# Altium PCB ZYNQ_BOARD.PcbDoc (part 7 of 9)
Units mm, origin at the board's own origin, x right, y up, seen from the top; angles counter-clockwise.
Board outline 120 x 66 mm, 10 copper layers (Top Layer, Internal Plane 1 (GND), Middle Layer 1, Middle Layer 2, Internal Plane 2 (+1.0V), Middle Layer 3, Middle Layer 4, Middle Layer 5 (PWR), Internal Plane 3 (GND), Bottom Layer), stack 0.982 mm thick; 333 components, 331 nets, 1511 pads, 1077 vias.
Unrouted connection lines stored in the file: 30.
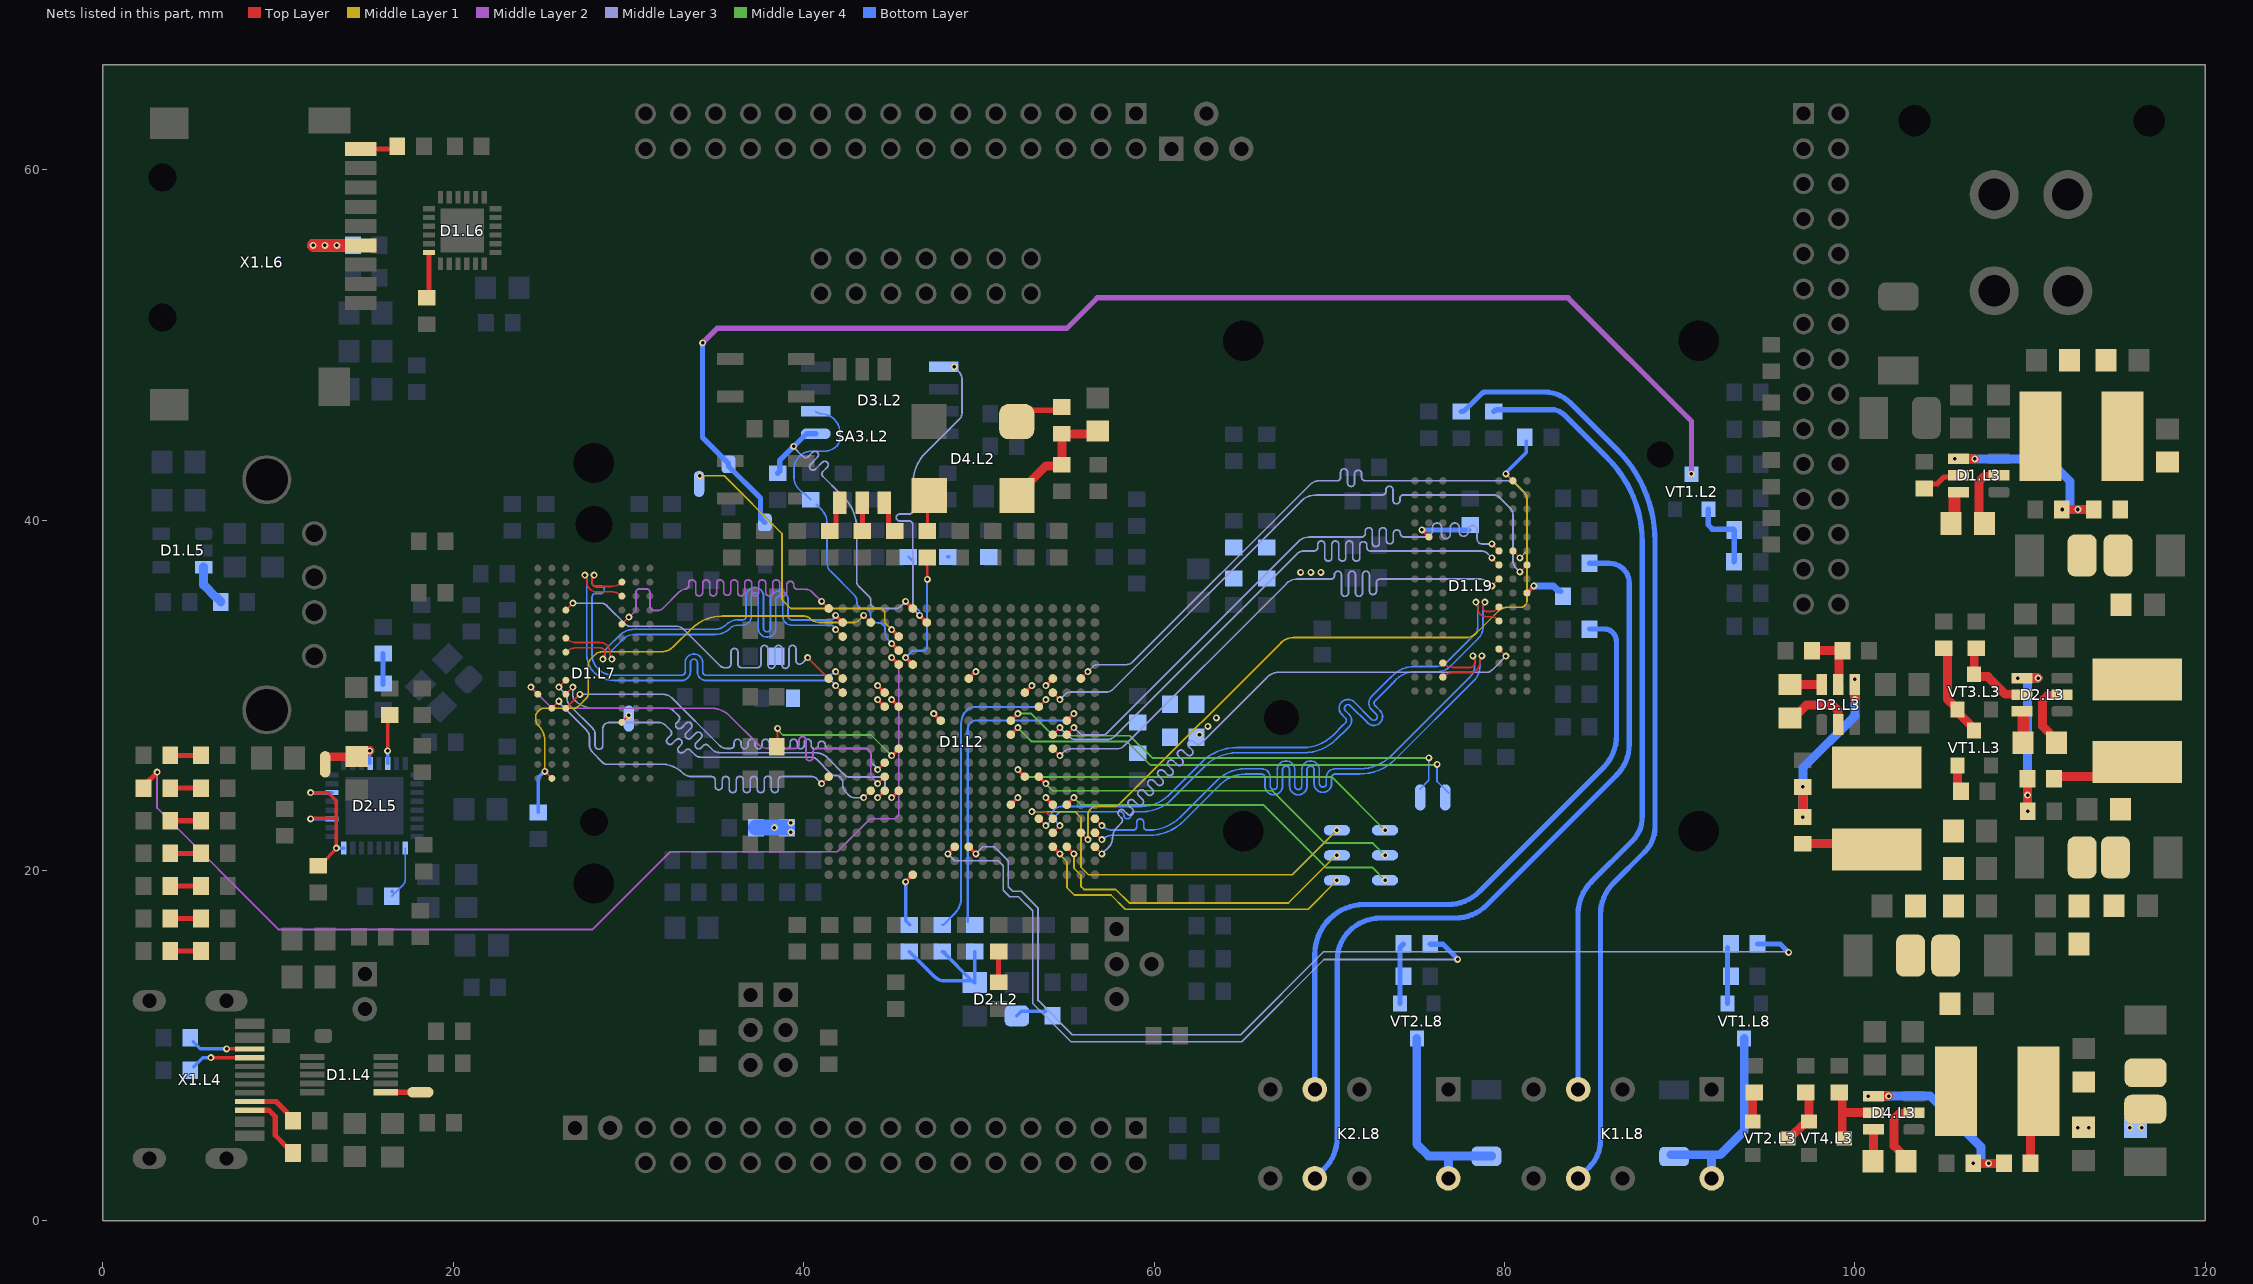
[diagram p15: the nets of this part, all layers, seen from the top]

## Via types
v1: diameter 0.4, hole 0.2, Top Layer to Bottom Layer, 1059 vias
v2: diameter 0.9, hole 0.6, Top Layer to Bottom Layer, 18 vias

## Nets (pads, with @x,y where several pads share a name; then routed paths per layer and width w, separated by ;. In a path a pad name is that pad's centre, name@x,y a point inside that pad or via, vN(x,y) a via of type N, cw(c..) or ccw(c..) an arc to the next point about the centre after c; other vN are vias at no path point) (continued)
LDM_M: D1.L2.A1 D1.L7.E7 | length 26.1
  Top Layer w0.1: D1.L7.E7@29.62,34.065 v1(30.02,34.465) ; v1(41.02,35.36) D1.L2.A1@41.42,34.96
  Middle Layer 2 w0.1: v1(30.02,34.465) 30.365,34.81 ccw(c30.232,34.943) 30.42,34.943 30.42,35.869 cw(c30.63,35.869) 30.63,36.079 31.01,36.079 cw(c31.01,35.869) 31.22,35.869 31.22,35.103 ccw(c31.493,35.103) 31.3,34.91 ccw(c31.443,35.053) 31.443,34.851 31.714,34.851 ccw(c31.714,35.164) 31.935,34.943 32.899,35.906 cw(c33.282,35.522) 33.175,36.054 cw(c33.282,35.522) 33.179,36.055 cw(c33.282,35.522) 33.229,36.062 33.239,36.063 ccw(c33.229,36.263) 33.429,36.263 33.429,36.394 cw(c33.629,36.394) 33.829,36.394 33.829,35.876 ccw(c34.029,35.876) 34.229,35.876 34.229,36.394 cw(c34.429,36.394) 34.629,36.394 34.629,35.876 ccw(c34.829,35.876) 35.029,35.876 35.029,36.394 cw(c35.229,36.394) 35.429,36.394 35.429,35.91 ccw(c35.629,35.91) 35.829,35.91 35.829,36.394 cw(c36.029,36.394) 36.229,36.394 36.229,35.876 ccw(c36.429,35.876) 36.629,35.876 36.629,36.394 cw(c36.829,36.394) 37.029,36.394 37.029,35.876 ccw(c37.229,35.876) 37.429,35.876 37.429,36.394 cw(c37.629,36.394) 37.829,36.394 37.829,35.876 ccw(c38.029,35.876) 38.229,35.876 38.229,36.394 cw(c38.429,36.394) 38.629,36.394 38.629,35.876 ccw(c38.829,35.876) 39.029,35.876 39.029,36.31 cw(c39.229,36.31) 39.429,36.31 39.429,36.265 ccw(c39.629,36.265) 39.629,36.065 40.039,36.065 40.104,36.062 cw(c40.039,35.398) 40.154,36.055 cw(c40.039,35.398) 40.223,36.039 cw(c40.039,35.398) 40.51,35.87 40.511,35.869 v1(41.02,35.36)
LDQS_M_N: D1.L2.B2 D1.L7.G3 | length 24.8
  Top Layer w0.1: D1.L7.G3@26.42,32.465 26.421,32.466 cw(c27.024,31.861) 27.024,32.715 28.391,32.715 cw(c28.391,32.466) 28.64,32.466 28.64,32.335 cw(c28.452,32.335) v1@28.585,32.202
  Top Layer w0.2: v1(41.82,34.56) D1.L2.B2@42.22,34.16
  Bottom Layer w0.1: v1(28.53,32.066) 28.53,32.069 cw(c28.718,32.069) 28.585,32.202 ccw(c28.452,32.335) 28.64,32.335 28.64,32.338 cw(c29.235,32.338) 28.814,32.759 29.462,33.406 cw(c30.358,32.509) 30.358,33.777 34.95,33.777 ccw(c34.95,34.64) 35.56,34.03 ; 35.561,34.031 cw(c36.235,33.357) 36.235,34.31 36.306,34.31 36.506,34.31 ccw(c36.506,34.51) 36.706,34.51 36.706,35.654 cw(c37.206,35.654) 37.706,35.654 37.706,33.825 ccw(c37.906,33.825) 38.106,33.825 38.106,35.457 cw(c38.606,35.457) 39.106,35.457 39.106,34.51 ccw(c39.306,34.51) 39.306,34.31 39.951,34.31 41.48,34.31 ccw(c41.48,34.714) 41.765,34.428 ccw(c41.634,34.56) v1(41.82,34.56)
LDQS_M_P: D1.L2.C2 D1.L7.F3 | length 24.8
  Top Layer w0.1: D1.L7.F3@26.42,33.265 ccw(c27.024,33.869) 27.024,33.015 28.391,33.015 cw(c28.391,32.466) 28.94,32.466 28.94,32.335 ccw(c29.128,32.335) v1@28.995,32.202 ; v1(41.82,33.76) D1.L2.C2@42.22,33.36
  Bottom Layer w0.1: v1(29.05,32.066) 29.05,32.069 ccw(c28.862,32.069) 28.995,32.202 cw(c29.128,32.335) 28.94,32.335 cw(c29.242,32.335) 29.028,32.548 29.673,33.193 cw(c30.36,32.505) 30.36,33.477 34.952,33.477 ccw(c34.952,34.634) 35.77,33.816 35.772,33.818 cw(c36.236,33.354) 36.236,34.01 36.306,34.01 36.506,34.01 ccw(c36.506,34.51) 37.006,34.51 37.006,35.654 cw(c37.206,35.654) 37.406,35.654 37.406,33.825 ccw(c37.906,33.825) 38.406,33.825 38.406,35.457 cw(c38.606,35.457) 38.806,35.457 38.806,34.51 ccw(c39.306,34.51) 39.306,34.01 39.951,34.01 41.48,34.01 cw(c41.48,33.606) 41.765,33.892 cw(c41.634,33.76) v1(41.82,33.76)
LDQS_N: D1.L2.U17 D1.L9.G3 | length 36.3
  Top Layer w0.1: D1.L2.U17@54.22,22.16 v1(54.62,22.56) ; v1@78.825,35.189 ccw(c78.958,35.056) 78.77,35.056 78.77,34.97 ccw(c78.927,34.97) 78.816,34.859 78.825,34.85 ccw(c78.958,34.983) 78.958,34.795 79.23,34.795 ccw(c79.23,35.295) 79.584,34.941 79.68,35.038 D1.L9.G3@79.68,35.045
  Bottom Layer w0.1: v1(54.62,22.56) cw(c54.62,22.601) 54.591,22.572 54.516,22.646 cw(c54.87,23) 54.37,23 cw(c54.684,23) 54.462,23.222 54.49,23.25 cw(c54.756,22.984) 54.756,23.36 57.624,23.36 58.074,23.36 cw(c58.074,23.16) 58.274,23.16 58.274,23.151 ccw(c58.474,23.151) 58.674,23.151 58.674,23.16 cw(c58.874,23.16) 58.874,23.36 59.304,23.36 59.514,23.369 ccw(c59.304,25.774) 59.564,23.374 ccw(c59.304,25.774) 61.011,24.067 62.92,25.976 cw(c64.716,24.18) 64.716,26.72 68.503,26.72 ccw(c68.503,29.441) 70.427,27.517 70.983,28.073 71.124,28.214 ccw(c70.771,28.568) 71.124,28.922 70.92,29.126 cw(c71.061,29.269) 71.203,29.409 ; 71.203,29.409 72.182,28.43 ccw(c72.536,28.783) 72.889,29.137 72.61,29.416 cw(c72.751,29.558) 72.61,29.7 73.583,30.673 ; 73.584,30.674 73.725,30.815 73.83,30.92 cw(c74.868,29.882) 74.868,31.35 76.133,31.35 ccw(c76.133,32.463) 76.92,31.676 78.513,33.269 ccw(c77.89,33.891) 78.718,33.592 ccw(c77.89,33.891) 78.77,33.891 78.77,35.056 cw(c78.958,35.056) 78.825,35.189 ccw(c78.692,35.322) 78.88,35.322 v1(78.88,35.325)
LDQS_P: D1.L2.T16 D1.L9.F3 | length 36.3
  Top Layer w0.1: D1.L2.T16@53.42,22.96 v1(53.82,22.56) ; v1@78.415,35.189 cw(c78.282,35.056) 78.47,35.056 78.47,34.969 ccw(c78.925,34.969) 78.603,34.648 78.614,34.637 ccw(c78.957,34.981) 78.957,34.495 79.23,34.495 cw(c79.23,33.995) 79.584,34.349 79.68,34.252 D1.L9.F3@79.68,34.245
  Bottom Layer w0.1: v1(53.82,22.56) ccw(c53.82,22.601) 53.849,22.572 53.924,22.646 ccw(c53.57,23) 54.07,23 54.07,23.002 cw(c54.68,23.002) 54.249,23.433 54.279,23.463 cw(c54.754,22.987) 54.754,23.66 59.303,23.66 ccw(c59.303,25.777) 60.8,24.28 62.709,26.189 cw(c64.715,24.183) 64.715,27.02 68.499,27.02 ccw(c68.499,29.451) 70.218,27.732 70.771,28.285 70.912,28.426 ; 70.912,28.71 70.707,28.915 cw(c71.061,29.269) 71.415,29.621 72.394,28.643 ; 70.913,28.427 ccw(c70.771,28.568) 70.912,28.71 ; 72.394,28.642 ccw(c72.536,28.783) 72.677,28.925 72.398,29.204 cw(c72.751,29.558) 72.398,29.912 73.371,30.886 ; 73.372,30.886 73.513,31.027 73.62,31.135 cw(c74.865,29.89) 74.865,31.65 76.132,31.65 ccw(c76.132,32.708) 76.142,31.65 ; 76.142,31.65 ccw(c76.133,32.463) 76.708,31.888 78.299,33.48 ccw(c77.89,33.891) 78.47,33.88 ccw(c77.642,33.893) 78.47,33.893 78.47,34.236 78.47,35.056 ccw(c78.282,35.056) 78.415,35.189 cw(c78.548,35.322) 78.36,35.322 v1(78.36,35.325)
MEM0_BUS.MEM_CLK_PSM.UDQS_PSM_N: D1.L2.F2 D1.L7.B7 | length 24.9
  Top Layer w0.1: v1@27.975,36.728 ccw(c28.108,36.595) 27.92,36.595 27.92,36.464 ccw(c28.169,36.464) 28.169,36.215 29.016,36.215 ccw(c29.016,37.069) D1.L7.B7@29.619,36.464 ; v1(41.82,31.36) D1.L2.F2@42.22,30.96
  Bottom Layer w0.1: v1(28.03,36.864) 28.03,36.861 cw(c27.842,36.861) 27.975,36.728 ccw(c28.108,36.595) 27.92,36.595 27.92,36.42 ccw(c28.12,36.42) 28.12,36.22 28.419,36.22 cw(c28.419,36.02) 28.419,35.82 28.12,35.82 ccw(c28.12,35.62) 27.92,35.62 27.92,32.303 ccw(c29.013,32.303) 28.24,31.53 ccw(c29.157,32.447) 29.157,31.15 32.83,31.15 33.03,31.15 ccw(c33.03,31.35) 33.23,31.35 33.23,31.864 cw(c33.73,31.864) 34.23,31.864 34.23,31.35 ccw(c34.43,31.35) 34.43,31.15 35.96,31.15 41.266,31.15 ccw(c41.266,32.004) v1@41.87,31.4
MEM0_BUS.MEM_CLK_PSM.UDQS_PSM_P: D1.L2.G2 D1.L7.C7 | length 24.8
  Top Layer w0.1: v1@27.565,36.728 cw(c27.432,36.595) 27.62,36.595 27.62,36.464 ccw(c28.169,36.464) 28.169,35.915 29.016,35.915 cw(c29.016,35.061) D1.L7.C7@29.62,35.665 ; v1(41.82,30.56) D1.L2.G2@42.22,30.16
  Bottom Layer w0.1: v1(27.51,36.864) 27.51,36.861 ccw(c27.698,36.861) 27.565,36.728 cw(c27.432,36.595) 27.62,36.595 27.62,32.3 ccw(c29.007,32.3) 28.026,31.32 28.03,31.316 ccw(c29.155,32.441) 29.155,30.85 32.83,30.85 33.03,30.85 ccw(c33.03,31.35) 33.53,31.35 33.53,31.864 cw(c33.73,31.864) 33.93,31.864 33.93,31.35 ccw(c34.43,31.35) 34.43,30.85 35.96,30.85 41.266,30.85 cw(c41.266,29.996) v1@41.87,30.6
MEM0_BUS.MEM_CMD_PSM.CAS_PSM: D1.L2.P5 D1.L7.K3 | length 25.8
  Top Layer w0.1: D1.L7.K3@26.42,30.065 v1(26.82,30.465) ; v1(44.22,24.16) D1.L2.P5@44.62,24.56
  Middle Layer 3 w0.1: 26.82,29.998 ccw(c27.208,29.998) 26.934,29.723 ccw(c28.055,30.845) 28.055,29.259 32.292,29.259 cw(c32.292,28.923) 32.53,29.161 32.64,29.051 32.856,28.834 cw(c32.715,28.693) 32.856,28.552 32.746,28.441 ccw(c32.887,28.3) 32.746,28.158 ccw(c32.887,28.3) 33.029,28.158 33.28,28.41 cw(c33.422,28.268) 33.563,28.41 cw(c33.422,28.268) 33.563,28.127 33.292,27.855 ccw(c33.433,27.714) 33.292,27.572 ccw(c33.433,27.714) 33.574,27.572 33.846,27.844 cw(c33.987,27.703) 34.129,27.844 cw(c33.987,27.703) 34.129,27.561 33.857,27.29 ccw(c33.999,27.148) 33.857,27.007 ccw(c33.999,27.148) 34.14,27.007 34.271,27.137 cw(c34.412,26.996) 34.554,27.137 34.589,27.102 34.781,26.91 ccw(c35.22,27.349) 35.22,26.728 40.676,26.728 cw(c40.676,25.798) 41.333,26.456 42.369,25.42 ccw(c42.542,25.593) 42.542,25.348 44.352,25.348 cw(c44.352,25.046) 44.565,25.26 cw(c44.391,25.086) 44.637,25.086 44.637,24.824 cw(c44.066,24.824) 44.47,24.42 44.22,24.17 v1(44.22,24.16) cw(c44.22,24.235) v1@44.167,24.182 ; 26.82,29.999 v1(26.82,30.465)
MEM0_BUS.MEM_CMD_PSM.CS_PSM: D1.L2.N1 D1.L7.L2 | length 25.7
  Top Layer w0.1: D1.L7.L2@25.62,29.265 v1(26.02,29.665) ; v1(41.02,24.96) D1.L2.N1@41.42,25.36
  Middle Layer 3 w0.1: v1(26.02,29.665) 26.02,29.601 27.59,28.032 cw(c27.156,27.598) 27.769,27.598 27.769,27.173 ccw(c28.386,27.173) 27.95,26.737 28.495,26.191 ccw(c28.803,26.497) 28.803,26.064 31.917,26.064 cw(c31.917,24.421) 33.078,25.583 ccw(c33.607,26.112) 33.507,25.37 ccw(c33.607,26.112) 33.607,25.364 34.167,25.364 34.747,25.364 cw(c34.747,25.164) 34.947,25.164 34.947,24.803 ccw(c35.147,24.803) 35.347,24.803 35.347,25.171 cw(c35.547,25.171) 35.747,25.171 35.747,24.648 ccw(c35.947,24.648) 36.147,24.648 36.147,25.171 cw(c36.347,25.171) 36.547,25.171 36.547,24.648 ccw(c36.747,24.648) 36.947,24.648 36.947,25.171 cw(c37.147,25.171) 37.347,25.171 37.347,24.648 ccw(c37.547,24.648) 37.747,24.648 37.747,25.189 cw(c37.947,25.189) 38.147,25.189 38.147,24.648 ccw(c38.347,24.648) 38.547,24.648 38.547,25.164 cw(c38.747,25.164) 38.747,25.364 38.797,25.364 40.466,25.364 cw(c40.466,25.001) 40.723,25.257 v1(41.02,24.96)
MEM0_BUS.MEM_CMD_PSM.RAS_PSM: D1.L2.P4 D1.L7.J3 | length 25.7
  Top Layer w0.1: v1(26.02,30.465) D1.L7.J3@26.42,30.865 ; v1(43.42,24.16) D1.L2.P4@43.82,24.56
  Middle Layer 3 w0.1: v1(26.02,30.465) 26.366,30.119 cw(c26.068,29.82) 26.49,29.82 ccw(c27.088,29.82) 26.665,29.397 27.976,28.086 cw(c27.702,27.811) 28.09,27.811 28.09,27.143 ccw(c28.31,27.143) 28.31,26.923 ccw(c28.31,27.143) 28.53,27.143 28.53,28.11 cw(c28.849,28.11) 28.623,28.335 cw(c28.921,28.039) 28.921,28.459 31.74,28.459 cw(c31.74,27.974) 32.056,28.342 cw(c31.74,27.974) 32.083,28.317 32.401,27.999 cw(c32.26,27.857) 32.401,27.716 32.228,27.542 ccw(c32.369,27.401) 32.228,27.26 ccw(c32.369,27.401) 32.511,27.26 32.71,27.459 cw(c32.852,27.318) 32.993,27.459 cw(c32.852,27.318) 32.993,27.176 32.867,27.05 ccw(c33.009,26.909) 32.867,26.768 ccw(c33.009,26.909) 33.15,26.768 33.25,26.867 cw(c33.391,26.726) 33.533,26.867 33.801,26.599 33.812,26.588 ccw(c34.1,26.898) 33.851,26.556 ccw(c34.1,26.898) 33.939,26.507 ccw(c34.1,26.898) 34.1,26.475 40.43,26.475 cw(c40.43,26.032) 40.743,26.345 41.58,25.509 ccw(c41.77,25.699) 41.77,25.43 41.848,25.43 cw(c41.848,25.151) 42.045,25.348 42.15,25.244 cw(c41.955,25.05) 42.23,25.05 42.23,24.865 ccw(c42.752,24.865) 42.382,24.496 42.6,24.279 ; 42.6,24.278 ccw(c42.889,24.571) 42.889,24.16 ; 42.89,24.16 v1(43.42,24.16)
MEM0_BUS.MEM_CMD_PSM.WE_PSM: D1.L2.M5 D1.L7.L3 | length 25.7
  Top Layer w0.1: D1.L7.L3@26.42,29.265 v1@27.215,30.06 ; v1(44.22,25.76) D1.L2.M5@44.62,26.16
  Middle Layer 3 w0.1: v1@27.214,30.059 31.971,30.059 ; 31.972,30.059 cw(c31.972,29.334) 32.485,29.847 32.486,29.846 35.19,27.142 35.191,27.141 ccw(c35.596,27.545) 35.596,26.973 35.773,26.973 35.823,26.973 ccw(c35.823,27.173) 36.023,27.173 36.023,27.297 cw(c36.223,27.297) 36.423,27.297 36.423,27.153 ccw(c36.623,27.153) 36.823,27.153 36.823,27.297 cw(c37.023,27.297) 37.223,27.297 37.223,27.153 ccw(c37.423,27.153) 37.623,27.153 37.623,27.297 cw(c37.823,27.297) 38.023,27.297 38.023,27.153 ccw(c38.223,27.153) 38.423,27.153 38.423,27.297 cw(c38.623,27.297) 38.823,27.297 38.823,27.153 ccw(c39.023,27.153) 39.223,27.153 39.223,27.297 cw(c39.423,27.297) 39.623,27.297 39.623,27.153 ccw(c39.823,27.153) 40.023,27.153 40.023,27.297 cw(c40.223,27.297) 40.423,27.297 40.423,27.153 ccw(c40.623,27.153) 40.823,27.153 40.823,27.183 cw(c41.023,27.183) 41.223,27.183 41.223,27.173 ccw(c41.423,27.173) 41.423,26.973 42.227,26.973 43.523,26.973 43.526,26.973 cw(c43.506,26.645) 43.835,26.645 ; 43.835,26.644 43.835,26.362 ccw(c44.262,26.362) 43.96,26.06 44.192,25.828 cw(c44.123,25.76) v1(44.22,25.76)
  other v1: 27.22,30.055
MEM0_BUS.nRST_PSM: D1.L2.B4 D1.L7.T2 R2.L7.2 | length 29.2
  Top Layer w0.1: v1(25.22,25.665) D1.L7.T2@25.62,25.265 ; v1(43.42,34.56) D1.L2.B4@43.82,34.16
  Middle Layer 1 w0.1: v1(25.22,25.665) 25.22,27.394 ccw(c23.957,27.394) 24.85,28.287 cw(c25.212,28.649) 24.7,28.649 24.7,28.77 cw(c25.159,28.77) 24.834,29.094 24.87,29.13 cw(c25.208,28.792) 25.208,29.27 25.979,29.27 25.985,29.27 26.876,29.27 ccw(c26.877,29.641) 27.14,29.379 27.594,29.833 ccw(c27.355,30.073) 27.693,30.073 27.693,31.677 cw(c28.297,31.677) 27.87,32.103 28.099,32.333 cw(c28.476,31.955) 28.476,32.489 31.859,32.489 ccw(c31.859,33.475) 32.556,32.778 33.563,33.785 cw(c35.359,31.988) 35.359,34.528 40.009,34.528 cw(c40.009,34.025) 40.365,34.381 ccw(c40.897,34.913) 40.897,34.161 42.859,34.161 ccw(c42.859,34.551) 43.135,34.275 v1(43.42,34.56)
  Bottom Layer w0.2: R2.L7.2@24.834,23.32 24.852,23.338 24.852,25.311 v1@25.195,25.654
MEM0_BUS.ODT_PSM: D1.L2.N5 D1.L7.K1 | length 26.2
  Top Layer w0.1: v1(24.42,30.465) D1.L7.K1@24.82,30.065 ; v1(44.22,24.96) D1.L2.N5@44.62,25.36
  Middle Layer 3 w0.1: v1(24.42,30.465) v1@24.466,30.419 ; v1@44.22,24.923 v1(44.22,24.96)
  Middle Layer 2 w0.1: v1(24.42,30.465) 25.486,29.399 ccw(c25.81,29.724) 25.81,29.265 34.75,29.265 cw(c34.75,27.853) 35.749,28.851 37.393,27.207 37.394,27.206 ccw(c37.953,27.765) 37.953,26.975 ; 37.954,26.975 39.481,26.975 39.531,26.975 ccw(c39.531,27.175) 39.731,27.175 39.731,27.442 cw(c39.931,27.442) 40.131,27.442 40.131,26.475 ccw(c40.331,26.475) 40.531,26.475 40.531,26.775 cw(c40.731,26.775) 40.731,26.975 41.391,26.975 43.484,26.975 cw(c43.484,26.682) 43.691,26.889 43.73,26.85 cw(c43.489,26.609) 43.83,26.609 43.83,25.457 ccw(c44.087,25.457) 43.905,25.275 v1(44.22,24.96)
MEM0_BUS.UDM_PSM: D1.L2.F1 D1.L7.D3 | length 25.7
  Top Layer w0.1: D1.L7.D3@26.42,34.865 v1(26.82,35.265) ; v1@40.232,32.148 D1.L2.F1@41.42,30.96
  Middle Layer 3 w0.1: v1(26.82,35.265) 28.428,35.265 cw(c28.428,34.79) 28.763,35.126 28.764,35.125 29.853,34.037 ccw(c30.069,34.253) 30.069,33.947 ; 30.07,33.947 32.705,33.947 cw(c32.705,33.309) 33.156,33.76 35.236,31.68 35.237,31.679 ccw(c35.467,31.91) 35.467,31.584 ; 35.468,31.584 35.592,31.584 35.642,31.584 ccw(c35.642,31.784) 35.842,31.784 35.842,32.482 cw(c36.042,32.482) 36.242,32.482 36.242,31.784 ccw(c36.442,31.784) 36.442,31.584 36.992,31.584 37.306,31.584 37.356,31.584 ccw(c37.356,31.784) 37.556,31.784 37.556,32.657 cw(c37.756,32.657) 37.956,32.657 37.956,31.741 ccw(c38.156,31.741) 38.356,31.741 38.356,32.657 cw(c38.556,32.657) 38.756,32.657 38.756,31.741 ccw(c38.956,31.741) 39.156,31.741 39.156,32.657 ; 39.156,32.657 cw(c39.356,32.657) 39.556,32.657 39.556,31.983 ccw(c39.756,31.983) 39.832,31.798 39.924,31.836 40.066,31.978 40.209,32.121 ccw(c40.17,32.16) v1(40.225,32.16)
MEM0_BUS.VREF_PSM: C1.L2.1 D1.L2.H6 D1.L2.P6 R6.L7.1 | length 2.9
  Top Layer w0.2: v1(45.02,24.16) D1.L2.P6@45.42,24.56 ; v1(45.02,29.76) D1.L2.H6@45.42,29.36
  Bottom Layer w0.1: C1.L2.1@39.269,22.712 C1.L2.1@39.284,22.712 ; C1.L2.1@39.27,22.41 C1.L2.1@39.285,22.41
  Bottom Layer w0.9: R6.L7.1@37.27,22.453 C1.L2.1@39.042,22.454
  other v1: 39.26,22.19 38.33,22.453 39.259,22.722
MEM1_BUS.MEM_CLK.UDQS_N: D1.L2.U20 D1.L9.B7 | length 36.3
  Top Layer w0.1: D1.L2.U20@56.62,22.16 v1(57.02,21.76) ; D1.L9.B7@76.48,31.045 76.497,31.062 cw(c77.06,30.498) 77.06,31.295 78.034,31.295 ccw(c78.034,31.814) 78.401,31.447 78.421,31.467 ccw(c77.989,31.899) 78.6,31.899 78.6,31.986 cw(c78.788,31.986) v1@78.655,32.119
  Bottom Layer w0.1: v1(57.02,21.76) cw(c57.624,21.156) 57.624,22.01 59.699,22.01 ccw(c59.699,24.847) 61.705,22.841 63.78,24.916 cw(c65.576,23.12) 63.79,24.926 cw(c65.213,23.485) 65.213,25.51 65.227,25.51 66.127,25.51 cw(c66.127,25.31) 66.327,25.31 66.327,24.828 ccw(c66.827,24.828) 67.327,24.828 67.327,25.763 cw(c67.527,25.763) 67.727,25.763 67.727,24.828 ccw(c68.227,24.828) 68.727,24.828 68.727,25.763 cw(c68.927,25.763) 69.127,25.763 69.127,24.968 ccw(c69.627,24.968) 70.127,24.968 70.127,25.31 cw(c70.327,25.31) 70.327,25.51 71.541,25.51 71.665,25.51 71.739,25.51 ccw(c71.739,28.347) 73.745,26.341 78.262,30.857 ccw(c77.445,31.674) 78.6,31.674 78.6,31.986 cw(c78.788,31.986) 78.655,32.119 ccw(c78.522,32.252) 78.71,32.252 v1(78.71,32.255)
MEM1_BUS.MEM_CLK.UDQS_P: D1.L2.T20 D1.L9.C7 | length 36.3
  Top Layer w0.1: D1.L2.T20@56.62,22.96 v1(57.02,22.56) ; D1.L9.C7@76.48,31.845 76.497,31.828 ccw(c77.06,32.392) 77.06,31.595 78.033,31.595 ccw(c78.033,31.817) 78.19,31.66 78.208,31.678 ccw(c77.986,31.9) 78.3,31.9 78.3,31.986 ccw(c78.112,31.986) v1@78.245,32.119
  Bottom Layer w0.1: v1(57.02,22.56) ccw(c57.624,23.164) 57.624,22.31 58.754,22.31 58.8,22.31 58.804,22.31 ccw(c58.804,22.51) 59.004,22.51 59.004,22.75 cw(c59.204,22.75) 59.404,22.75 59.404,22.51 ccw(c59.604,22.51) 59.604,22.31 59.698,22.31 59.894,22.318 ccw(c59.698,24.85) 59.944,22.322 ccw(c59.698,24.85) 61.494,23.054 63.569,25.129 cw(c65.213,23.485) 65.213,25.81 65.227,25.81 66.127,25.81 cw(c66.127,25.31) 66.627,25.31 66.627,24.828 ccw(c66.827,24.828) 67.027,24.828 67.027,25.763 cw(c67.527,25.763) 68.027,25.763 68.027,24.828 ccw(c68.227,24.828) 68.427,24.828 68.427,25.763 cw(c68.927,25.763) 69.427,25.763 69.427,24.968 ccw(c69.627,24.968) 69.827,24.968 69.827,25.31 cw(c70.327,25.31) 70.327,25.81 71.665,25.81 71.738,25.81 ccw(c71.738,28.35) 73.534,26.554 78.048,31.068 ccw(c77.441,31.676) 78.3,31.676 78.3,31.986 ccw(c78.112,31.986) 78.245,32.119 cw(c78.378,32.252) 78.19,32.252 v1(78.19,32.255)
MEM1_BUS.MEM_CMD.CAS: D1.L2.K17 D1.L9.K3 | length 37.2
  Top Layer w0.1: D1.L2.K17@54.22,27.76 v1(54.62,28.16) ; v1(79.28,37.845) D1.L9.K3@79.68,37.445
  Middle Layer 3 w0.1: v1(54.62,28.16) 55.14,27.64 ccw(c55.53,28.03) 55.53,27.479 57.319,27.479 ; 57.319,27.479 ccw(c57.319,28.037) 57.715,27.643 68.161,38.089 cw(c68.531,37.719) 68.531,38.242 69.09,38.242 69.14,38.242 ccw(c69.14,38.442) 69.34,38.442 69.34,38.613 cw(c69.54,38.613) 69.74,38.613 69.74,37.863 ccw(c69.94,37.863) 70.14,37.863 70.14,38.613 cw(c70.34,38.613) 70.54,38.613 70.54,37.863 ccw(c70.74,37.863) 70.94,37.863 70.94,38.613 cw(c71.14,38.613) 71.34,38.613 71.34,37.863 ccw(c71.54,37.863) 71.74,37.863 71.74,38.574 cw(c71.94,38.574) 72.14,38.574 72.14,38.442 ccw(c72.34,38.442) 72.34,38.242 73.285,38.242 78.637,38.242 cw(c78.637,37.649) 79.056,38.069 v1(79.28,37.845)
MEM1_BUS.MEM_CMD.CS: D1.L2.F19 D1.L9.L2 | length 37.2
  Top Layer w0.1: D1.L2.F19@55.82,30.96 v1(56.22,31.36) ; D1.L9.L2@80.48,38.245 v1(80.88,37.845)
  Middle Layer 3 w0.1: v1(56.22,31.36) 56.511,31.651 cw(c56.75,31.412) 56.75,31.75 58.38,31.75 ccw(c58.38,32.321) 58.784,31.917 68.904,42.037 cw(c69.417,41.525) 69.417,42.25 70.392,42.25 70.442,42.25 ccw(c70.442,42.45) 70.642,42.45 70.642,42.731 cw(c70.842,42.731) 71.042,42.731 71.042,42.124 ccw(c71.242,42.124) 71.442,42.124 71.442,42.655 cw(c71.642,42.655) 71.842,42.655 71.842,42.45 ccw(c72.042,42.45) 72.042,42.25 73.134,42.25 80.168,42.25 cw(c80.168,41.568) 80.65,42.05 81.021,41.679 cw(c80.382,41.04) 81.286,41.04 81.286,38.251 v1(80.88,37.845)
MEM1_BUS.MEM_CMD.RAS: D1.L2.L17 D1.L9.J3 | length 37.2
  Top Layer w0.1: D1.L2.L17@54.22,26.96 v1(54.62,26.56) ; v1(79.28,36.245) D1.L9.J3@79.68,36.645
  Middle Layer 3 w0.1: v1(54.62,26.56) 54.81,26.75 cw(c55.3,26.26) 55.3,26.953 57.878,26.953 ; 57.878,26.953 ccw(c57.878,27.544) 58.297,27.127 67.558,36.388 cw(c68.161,35.785) 68.161,36.637 70.04,36.637 70.09,36.637 ccw(c70.09,36.837) 70.29,36.837 70.29,36.885 cw(c70.49,36.885) 70.69,36.885 70.69,35.853 ccw(c70.89,35.853) 71.09,35.853 71.09,36.885 cw(c71.29,36.885) 71.49,36.885 71.49,35.853 ccw(c71.69,35.853) 71.89,35.853 71.89,36.885 cw(c72.09,36.885) 72.29,36.885 72.29,35.958 ccw(c72.49,35.958) 72.69,35.958 72.69,36.437 cw(c72.89,36.437) 72.89,36.637 73.285,36.637 78.631,36.637 cw(c78.631,36.018) 79.069,36.456 79.07,36.455 v1(79.28,36.245)
MEM1_BUS.MEM_CMD.WE: D1.L2.K18 D1.L9.L3 | length 37.2
  Top Layer w0.1: D1.L2.K18@55.02,27.76 v1(55.42,28.16) ; v1(79.28,38.645) D1.L9.L3@79.68,38.245
  Middle Layer 3 w0.1: v1(55.42,28.16) 55.779,27.801 ccw(c55.921,27.943) 55.921,27.742 57.086,27.742 ccw(c57.086,28.003) 57.271,27.818 68.246,38.794 cw(c68.85,38.189) 68.85,39.044 71.803,39.044 71.853,39.044 ccw(c71.853,39.244) 72.053,39.244 72.053,39.37 cw(c72.253,39.37) 72.453,39.37 72.453,38.694 ccw(c72.653,38.694) 72.853,38.694 72.853,39.37 cw(c73.053,39.37) 73.253,39.37 73.253,38.849 ccw(c73.453,38.849) 73.653,38.849 73.653,39.244 cw(c73.853,39.244) 74.053,39.244 ccw(c74.253,39.244) 74.253,39.044 74.58,39.044 75.499,39.044 ccw(c75.499,39.441) 75.78,39.16 ccw(c75.513,39.427) 75.89,39.427 75.89,39.584 cw(c76.145,39.584) 76.145,39.838 cw(c76.145,39.584) 76.399,39.584 76.399,39.2 ccw(c76.653,39.2) 76.653,38.946 ccw(c76.653,39.2) 76.907,39.2 76.907,39.584 cw(c77.161,39.584) 77.161,39.838 cw(c77.161,39.584) 77.416,39.584 77.416,39.334 ccw(c77.67,39.334) 77.67,39.08 ccw(c77.67,39.334) 77.924,39.334 77.924,39.449 cw(c78.178,39.449) 78.178,39.703 cw(c78.178,39.449) 78.432,39.449 78.432,38.956 ccw(c78.766,38.956) 78.53,38.72 ccw(c78.711,38.901) 78.711,38.645 v1(79.28,38.645)
MEM1_BUS.nRST: D1.L2.U19 D1.L9.T2 R2.L9.2 | length 42.7
  Top Layer w0.1: D1.L2.U19@55.82,22.16 v1(56.22,21.76) ; v1(80.08,42.645) D1.L9.T2@80.48,42.245
  Middle Layer 1 w0.1: v1(56.22,21.76) 56.224,21.764 56.224,22.597 ; 56.224,22.598 56.224,23.173 ; 56.224,23.174 cw(c56.687,23.174) 56.36,23.503 cw(c56.79,23.072) 56.79,23.68 57.646,23.68 ccw(c57.646,24.326) 58.103,23.869 67.247,33.013 cw(c67.94,32.319) 67.94,33.3 77.771,33.3 ; 77.772,33.3 ccw(c77.772,34.184) 78.398,33.56 79.654,34.816 cw(c80.17,34.3) 80.17,35.03 80.921,35.03 ; v1(80.08,42.645) 81.116,41.609 cw(c80.706,41.2) 81.285,41.2 81.285,35.405 cw(c80.903,35.405) 81.174,35.135 cw(c80.921,35.386) 80.921,35.03
  Bottom Layer w0.2: v1(80.08,42.645) 80.08,42.704 81.24,43.864 R2.L9.2@81.24,44.51
MEM1_BUS.ODT_DDR: D1.L2.G17 D1.L9.K1 | length 37.2
  Top Layer w0.1: D1.L2.G17@54.22,30.16 v1(54.62,29.76) ; v1(80.88,37.045) D1.L9.K1@81.28,37.445
  Middle Layer 3 w0.1: v1(54.62,29.76) 54.931,30.071 cw(c55.211,29.791) 55.211,30.187 57.252,30.187 ccw(c57.253,30.747) 57.65,30.352 68.389,41.091 cw(c69.237,40.243) 69.237,41.442 72.98,41.442 73.03,41.442 ccw(c73.03,41.642) 73.23,41.642 73.23,41.738 cw(c73.43,41.738) 73.63,41.738 73.63,41.134 ccw(c73.83,41.134) 74.03,41.134 74.03,41.242 cw(c74.23,41.242) 74.23,41.442 75.915,41.442 79.39,41.442 cw(c79.39,41.013) 79.693,41.317 80.326,40.684 cw(c79.953,40.31) 80.481,40.31 80.481,37.71 ccw(c81.122,37.709) 80.669,37.256 v1(80.88,37.045)
MEM1_BUS.UDM: D1.L2.V20 D1.L9.D3 | length 37.2
  Top Layer w0.1: D1.L2.V20@56.62,21.36 v1(57.02,20.96) ; D1.L9.D3@79.68,32.645 v1(80.08,32.245)
  Middle Layer 3 w0.1: v1(57.02,20.96) 57.429,21.369 ccw(c56.968,21.83) 57.62,21.83 cw(c58.545,21.83) 57.891,22.484 58.095,22.688 58.13,22.723 ccw(c57.989,22.865) 58.13,23.006 57.993,23.143 cw(c58.135,23.284) 57.993,23.426 ; 57.993,23.426 cw(c58.135,23.284) 58.276,23.426 ; 58.276,23.426 58.483,23.219 ccw(c58.625,23.36) 58.766,23.219 ccw(c58.625,23.36) 58.766,23.501 58.559,23.709 cw(c58.7,23.85) 58.559,23.991 cw(c58.7,23.85) 58.842,23.991 59.049,23.784 ccw(c59.19,23.926) 59.332,23.784 ccw(c59.19,23.926) 59.332,24.067 59.125,24.274 cw(c59.266,24.416) 59.125,24.557 cw(c59.266,24.416) 59.408,24.557 59.615,24.35 ccw(c59.756,24.491) 59.898,24.35 ccw(c59.756,24.491) 59.898,24.633 59.69,24.84 cw(c59.832,24.981) 59.69,25.123 cw(c59.832,24.981) 59.973,25.123 60.18,24.916 ccw(c60.322,25.057) 60.463,24.916 ccw(c60.322,25.057) 60.463,25.198 60.256,25.406 cw(c60.398,25.547) 60.256,25.689 cw(c60.398,25.547) 60.539,25.689 60.746,25.481 ccw(c60.888,25.623) 61.029,25.481 ccw(c60.888,25.623) 61.029,25.764 60.822,25.971 cw(c60.963,26.113) 60.822,26.254 cw(c60.963,26.113) 61.105,26.254 61.312,26.047 ccw(c61.453,26.188) 61.595,26.047 ccw(c61.453,26.188) 61.595,26.33 61.387,26.537 cw(c61.529,26.678) 61.387,26.82 cw(c61.529,26.678) 61.67,26.82 61.877,26.613 ccw(c62.019,26.754) 62.16,26.613 ccw(c62.019,26.754) 62.16,26.896 61.98,27.075 cw(c62.122,27.217) 61.98,27.358 cw(c62.122,27.217) 62.263,27.358 62.373,27.249 ccw(c62.514,27.39) 62.656,27.249 63.112,27.705 66.446,31.04 cw(c67.12,30.366) 67.12,31.319 78.983,31.319 ; 78.984,31.319 ccw(c78.984,31.739) 79.282,31.442 80.08,32.24 v1(80.08,32.245)
MEM1_BUS.VREF_FPGA: C14.L9.2 C15.L9.1 C16.L9.1 C17.L9.1 D1.L9.H1 D1.L9.M8 R4.L9.1 R5.L9.2 R7.L2.2 R8.L2.2 | length 5.5
  Top Layer w0.2: v1(75.28,39.445) D1.L9.M8@75.68,39.045 ; D1.L9.H1@81.28,35.845 v1(81.68,36.245)
  Bottom Layer w0.3: v1(75.28,39.445) C17.L9.1@77.962,39.445 ; C16.L9.1@83.025,36.02 83.119,36.02 C16.L9.1@83.201,35.938
  Bottom Layer w0.4: v1(81.68,36.245) 82.8,36.245 C16.L9.1@83.025,36.02
  other v1: 62.589,27.754 63.063,28.231 63.554,28.718 68.357,37.025 68.94,37.025 69.523,37.025
NetC5.L2_2: C5.L2.2 C6.L2.2 D2.L2.3 R12.L2.1 | length 8.8
  Bottom Layer w0.1: C6.L2.2@49.765,15.375 C6.L2.2@49.77,15.38
  Bottom Layer w0.2: R12.L2.1@46.03,15.38 47.461,13.949 ccw(c48.062,14.549) 48.062,13.7 49.548,13.7 cw(c49.548,13.393) D2.L2.3@49.625,13.69 ; C5.L2.2@47.9,15.38 cw(c47.9,15.152) C5.L2.2@48.062,15.313 ; C5.L2.2@47.992,15.323 D2.L2.3@49.625,13.69 ; D2.L2.3@49.695,13.62 D2.L2.3@49.625,13.69 ; C6.L2.2@49.77,15.38 49.77,13.615 D2.L2.3@49.765,13.61 ccw(c49.548,13.393) D2.L2.3@49.625,13.69
NetC10.L3_1: C10.L3.1 D1.L3.6 | length 1.7
  Top Layer w0.7: C10.L3.1@105.689,39.746 D1.L3.6@105.689,41.494
NetC10.L3_2: C10.L3.2 D1.L3.2 L1.L3.1 | length 3.7
  Top Layer w0.508: C10.L3.2@107.09,39.805 107.09,42.21 107.388,42.508 108.173,42.508 D1.L3.2@108.219,42.554
NetC10.L5_1: C10.L5.1 D2.L5.20 KP1.L5.1 | length 4.7
  Top Layer w0.508: KP1.L5.1@12.685,26.5 C10.L5.1@14.49,26.5 ; C10.L5.1@14.1,26.77 cw(c14.245,26.625) C10.L5.1@14.245,26.83 ; C10.L5.1@14.225,26.83 C10.L5.1@14.245,26.83 ; C10.L5.1@14.256,26.846 v1@15.232,26.846 ; v1@15.23,26.83 v1(15.22,26.83) C10.L5.1@14.245,26.83
  Bottom Layer w0.2: D2.L5.20@15.22,26.12 v1(15.22,26.83)
NetC11.L3_1: C11.L3.1 D2.L3.6 | length 1.7
  Top Layer w0.7: C11.L3.1@109.619,27.231 D2.L3.6@109.619,28.979
NetC11.L3_2: C11.L3.2 D2.L3.2 L2.L3.1 | length 4.4
  Top Layer w0.508: C11.L3.2@111.149,27.686 111.495,27.34 C11.L3.2@111.495,27.29 ; C11.L3.2@111.501,27.455 110.701,28.255 110.701,29.696 110.998,29.994 111.784,29.994 D2.L3.2@111.83,30.04
NetC12.L3_1: C12.L3.1 D3.L3.6 | length 1.8
  Top Layer w0.508: C12.L3.1@96.3,30.62 96.305,30.625 D3.L3.6@98.1,30.625
NetC12.L3_2: C12.L3.2 D3.L3.2 L3.L3.1 | length 3.6
  Top Layer w0.508: C12.L3.2@96.598,28.819 97.22,29.44 98.729,29.44 99.027,29.142 99.027,28.348 D3.L3.2@99.05,28.325
NetC13.L3_1: C13.L3.1 D4.L3.6 | length 1.9
  Top Layer w0.508: D4.L3.6@101.065,5.23 101.065,3.5 C13.L3.1@101.16,3.405
NetC13.L3_2: C13.L3.2 D4.L3.2 L4.L3.1 | length 3.8
  Top Layer w0.508: C13.L3.2@102.944,3.574 102.23,4.289 102.23,5.836 102.528,6.134 103.319,6.134 D4.L3.2@103.365,6.18
NetC14.L3_1: C14.L3.1 C18.L3.1 C22.L3.1 C26.L3.1 C30.L3.1 L1.L3.2 R10.L3.2 R18.L3.2
NetC15.L3_1: C15.L3.1 C19.L3.1 C23.L3.1 C27.L3.1 C31.L3.1 L2.L3.2 R12.L3.2 R19.L3.2 | length 2.4
  Top Layer w0.508: R12.L3.2@111.365,25.365 L2.L3.2@113.78,25.365
NetC16.L3_1: C16.L3.1 C20.L3.1 C24.L3.1 C28.L3.1 C32.L3.1 C34.L3.1 L3.L3.2 R14.L3.2 R21.L3.2 | length 4.3
  Top Layer w0.508: R14.L3.2@97.034,21.535 100.9,21.535 L3.L3.2@101.24,21.195
NetC17.L3_1: C17.L3.1 C21.L3.1 C25.L3.1 C29.L3.1 C33.L3.1 L4.L3.2 R16.L3.2 R20.L3.2 | length 4.3
  Top Layer w0.508: R16.L3.2@110.025,3.29 110.025,6.95 L4.L3.2@110.48,7.405
  other v1: 112.71,5.33 113.357,5.33 115.695,5.33 116.37,5.33
NetC32.L2_1: C32.L2.1 D4.L2.4 L2.L2.2 R33.L2.2 | length 6.6
  Top Layer w0.508: D4.L2.4@52.163,41.435 53.828,43.1 C32.L2.1@54.84,43.1 ; C32.L2.1@54.73,43.33 54.73,44.74 R33.L2.2@54.73,44.91 ; R33.L2.2@54.73,44.92 L2.L2.2@56.43,44.92
NetD1.L2_C6: D1.L2.C6 KP9.L2.1 | length 17.8
  Top Layer w0.2: v1(45.02,33.76) D1.L2.C6@45.42,33.36
  Middle Layer 1 w0.1: v1(34.075,42.525) 34.075,42.595 34.132,42.538 35.458,42.538 38.761,39.235 38.761,35.46 39.263,34.957 44.437,34.957 44.627,34.767 44.627,34.153 v1(45.02,33.76)
NetD1.L2_E7: D1.L2.E7 R19.L2.2 | length 7.3
  Top Layer w0.15: v1(47.055,36.625) 47.055,37.895 R19.L2.2@47.06,37.9
  Top Layer w0.2: v1(45.82,32.16) D1.L2.E7@46.22,31.76
  Bottom Layer w0.13: v1(45.82,32.16) 46.208,32.548 46.888,32.548 47.03,32.69 v1@47.03,36.6
  Bottom Layer w0.15: v1@47.03,36.6 v1(47.055,36.625) v1@47.08,36.65
NetD1.L2_F11: D1.L2.F11 R34.L2.2 | length 0.6
  Top Layer w0.2: D1.L2.F11@49.42,30.96 v1(49.82,31.36)
NetD1.L2_J9: D1.L2.J9 R35.L2.2 | length 0.6
  Top Layer w0.2: v1(47.42,28.96) D1.L2.J9@47.82,28.56
  Bottom Layer w0.2: R35.L2.2@48.22,37.9 R35.L2.2@48.27,37.9
NetD1.L2_J14: D1.L2.J14 KP2.L2.1 | length 27.1
  Top Layer w0.2: D1.L2.J14@51.82,28.56 v1(52.22,28.96)
  Middle Layer 4 w0.1: v1(52.22,28.96) 52.991,28.96 54.248,27.702 58.618,27.702 59.889,26.431 v1(75.68,26.431)
  Bottom Layer w0.1: KP2.L2.1@75.174,24.648 75.68,25.154 v1(75.68,26.431)
NetD1.L2_K14: D1.L2.K14 KP1.L2.1 | length 27.3
  Top Layer w0.2: D1.L2.K14@51.82,27.76 v1(52.22,28.16)
  Middle Layer 4 w0.1: v1(52.22,28.16) 53.017,27.363 58.451,27.363 59.784,26.029 v1@76.179,26.029
  Bottom Layer w0.1: v1(76.15,26.059) 76.15,25.086 KP1.L2.1@76.81,24.426
NetD1.L2_N15: D1.L2.N15 KP3.L2.1 | length 23
  Top Layer w0.2: v1(52.22,25.76) D1.L2.N15@52.62,25.36
  Middle Layer 4 w0.1: v1(52.22,25.76) 52.634,25.346 70.136,25.346 v1(73.177,22.305)
NetD1.L2_N16: D1.L2.N16 KP4.L2.1 | length 21.6
  Top Layer w0.2: D1.L2.N16@53.42,25.36 v1(53.82,24.96)
  Middle Layer 4 w0.1: v1(53.82,24.96) 54.22,24.56 66.75,24.56 69.74,21.57 72.487,21.57 v1(73.177,20.88)
NetD1.L2_R18: D1.L2.R18 KP6.L2.1 | length 20.3
  Top Layer w0.2: D1.L2.R18@55.02,23.76 v1(55.42,24.16)
  Middle Layer 4 w0.1: v1(55.42,24.16) 55.83,23.75 66.23,23.75 69.8,20.18 72.447,20.18 v1(73.177,19.45)
NetD1.L2_T17: D1.L2.T17 KP5.L2.1 | length 23
  Top Layer w0.1: v1(53.02,23.36) 53.82,23.36 D1.L2.T17@54.22,22.96
  Middle Layer 1 w0.1: v1(53.02,23.36) 55.487,23.36 55.818,23.029 55.818,20.202 56.256,19.764 67.89,19.764 v1(70.431,22.305)
NetD1.L2_V17: D1.L2.V17 KP7.L2.1 | length 19.3
  Top Layer w0.2: D1.L2.V17@54.22,21.36 v1(54.62,20.96)
  Middle Layer 1 w0.1: v1(54.62,20.96) 54.597,20.983 54.597,20.929 55.026,20.5 55.026,19.017 55.435,18.607 57.538,18.607 58.349,17.795 68.792,17.795 v1(70.431,19.435)
NetD1.L2_V18: D1.L2.V18 KP8.L2.1 | length 18.8
  Top Layer w0.2: D1.L2.V18@55.02,21.36 v1(55.42,20.96)
  Middle Layer 1 w0.1: v1(55.42,20.96) 55.42,20.145 55.819,19.746 55.819,19.101 56,18.92 57.81,18.92 58.575,18.156 67.666,18.156 v1@70.44,20.929
  other v1: 70.431,20.865
NetD1.L3_4: D1.L3.4 R10.L3.1 R11.L3.2 | length 12.4
  Top Layer w0.5: D1.L3.4@105.859,43.504 D1.L3.4@105.919,43.504 v1(106.845,43.504) v1@106.849,43.504
  Top Layer w0.508: R11.L3.2@111.81,40.61 v1(111.83,40.61) v1(112.72,40.61) R10.L3.1@113.63,40.61
  Bottom Layer w0.508: v1@105.69,43.504 v1(106.845,43.504) 110.996,43.504 112.275,42.225 112.275,40.61 ; v1(111.83,40.61) 112.275,40.61 ; v1(112.72,40.61) 112.275,40.61
  other v1: 105.689,43.504
NetD1.L3_5: D1.L3.5 R8.L3.2 | length 2.3
  Top Layer w0.3: R8.L3.2@103.964,41.814 104.222,42.072 104.692,42.072 105.078,42.458 105.823,42.458 D1.L3.5@105.919,42.554
NetD1.L4_6: D1.L4.6 TNOW.1 | length 2.2
  Top Layer w0.3: D1.L4.6@16.14,7.35 17.729,7.35 17.819,7.26 TNOW.1@18.35,7.26
NetD1.L5_3: D1.L5.3 R4.L5.1 | length 2.4
  Bottom Layer w0.508: D1.L5.3@5.74,37.32 5.74,36.31 6.474,35.576 6.524,35.576 6.72,35.38 R4.L5.1@6.72,35.33
NetD1.L6_24: D1.L6.24 R1.L6.2 | length 2.4
  Top Layer w0.3: D1.L6.24@18.61,55.28 18.61,52.99 R1.L6.2@18.71,52.89
NetD1.L7_M7: D1.L7.M7 KP1.L7.1 | length 0.8
  Top Layer w0.1: D1.L7.M7@29.62,28.465 v1(30.02,28.865)
  Bottom Layer w0.1: KP1.L7.1@30.015,28.953 30.108,28.86 30.015,28.86 v1(30.02,28.865)
NetD2.L2_1: D2.L2.1 R11.L2.1 | length 1.8
  Bottom Layer w0.2: D2.L2.1@52.165,11.71 52.427,11.972 R11.L2.1@53.825,11.972
NetD2.L3_4: D2.L3.4 R12.L3.1 R13.L3.2 | length 11.6
  Top Layer w0.5: D2.L3.4@109.53,30.99 v1(110.456,30.99)
  Top Layer w0.508: R12.L3.1@109.845,25.245 109.86,25.23 v1(109.86,24.305) v1(109.86,23.38)
  Bottom Layer w0.5: v1(109.3,30.99) 109.86,30.99 v1(110.456,30.99)
  Bottom Layer w0.508: v1@109.86,23.39 v1(109.86,24.305) 109.86,30.99
NetD2.L3_5: D2.L3.5 R6.L3.1 VT3.L3.3 | length 4.7
  Top Layer w0.508: R6.L3.1@106.92,32.695 106.81,32.585 VT3.L3.3@106.81,31.2 106.943,31.067 107.589,31.067 108.592,30.064 109.506,30.064 D2.L3.5@109.53,30.04
NetD2.L5_1: D2.L5.1 R5.L5.2 | length 3.1
  Bottom Layer w0.1: R5.L5.2@16.48,18.53 17.134,19.184 ccw(c16.856,19.463) 17.25,19.463 ; 17.25,19.464 D2.L5.1@17.25,21.28
  Bottom Layer w0.2: R5.L5.2@16.5,18.78 R5.L5.2@16.5,18.83
NetD2.L5_8: D2.L5.8 D2.L5.11 D2.L5.14 R10.L5.1 | length 9.9
  Top Layer w0.2: v1@11.85,22.98 13.324,22.98 ; v1(11.85,24.45) 12.864,24.45 13.324,23.99 v1(13.324,21.285) 13.324,21.237 R10.L5.1@12.508,20.421
  Bottom Layer w0.2: v1(11.85,22.95) D2.L5.11@13.08,22.95 ; v1(11.85,24.45) D2.L5.14@13.08,24.45 ; v1(13.324,21.285) 13.745,21.285 D2.L5.8@13.75,21.28
NetD2.L5_22: D2.L5.22 R9.L5.1 | length 2.8
  Top Layer w0.2: R9.L5.1@16.05,28.88 16.25,28.68 v1(16.25,26.83)
  Bottom Layer w0.2: D2.L5.22@16.25,26.12 v1(16.25,26.83)
NetD3.L3_4: D3.L3.4 R14.L3.1 R15.L3.2 | length 11.7
  Top Layer w0.5: v1(100,29.764) D3.L3.4@100,30.625 D3.L3.4@100,30.69
  Top Layer w0.508: v1(97.034,23.055) v1(97.034,24.776)
  Bottom Layer w0.508: v1(97.034,23.055) 97.034,25.854 100,28.82 v1(100,30.92)
NetD3.L3_5: D3.L3.5 R5.L3.2 R9.L3.1 | length 3.4
  Top Layer w0.508: R9.L3.1@97.55,32.555 R5.L3.2@99.285,32.555 R5.L3.2@99.285,32.505 ; D3.L3.5@99.08,30.695 R5.L3.2@99.08,32.34
NetD4.L2_1: D4.L2.1 R33.L2.1 | length 2.9
  Top Layer w0.3: D4.L2.1@52.157,45.645 D4.L2.1@52.592,46.08 ; D4.L2.1@52.592,46.27 R33.L2.1@54.88,46.27
NetD4.L3_4: D4.L3.4 R16.L3.1 R17.L3.2 | length 12.1
  Top Layer w0.5: D4.L3.4@101,7.13 D4.L3.4@101.065,7.13 v1(101.926,7.13)
  Top Layer w0.508: v1(106.75,3.29) v1(107.627,3.29) R16.L3.1@108.505,3.29
  Bottom Layer w0.5: v1(100.77,7.13) v1(101.926,7.13) 104.29,7.13 107.189,4.231 107.189,3.29 ; v1(106.75,3.29) 107.189,3.29 ; v1(107.627,3.29) 107.189,3.29
NetD4.L3_5: D4.L3.5 R7.L3.1 VT4.L3.3 | length 4.4
  Top Layer w0.508: VT4.L3.3@99.275,4.715 99.275,6.18 ; R7.L3.1@99.275,7.34 99.275,6.18 ; D4.L3.5@101.065,6.18 99.275,6.18
NetK1.L8_4: K1.L8.4 R2.L8.1 | length 45.5
  Bottom Layer w0.3: R2.L8.1@79.38,46.2 cw(c79.646,45.934) 79.646,46.31 82.67,46.31 cw(c82.67,45.249) 83.42,45.999 85.879,43.541 85.881,43.539 cw(c81.095,38.753) 87.863,38.753 87.863,38.751 87.863,23.075 cw(c85.893,23.075) 87.286,21.682 84.944,19.339 ccw(c86.74,17.543) 84.2,17.543 K1.L8.4@84.2,7.51
NetK1.L8_9: K1.L8.9 R1.L8.1 | length 54.3
  Bottom Layer w0.3: R1.L8.1@77.52,46.2 ccw(c77.52,46.541) 77.761,46.3 78.64,47.178 cw(c78.981,46.837) 78.981,47.32 82.255,47.32 82.256,47.32 cw(c82.256,45.187) 83.764,46.696 83.766,46.694 86.424,44.036 cw(c81.199,38.807) 88.591,38.807 88.591,38.806 88.591,22.489 cw(c86.594,22.489) 88.006,21.077 86.217,19.288 ccw(c88.013,17.492) 85.473,17.492 85.473,4.604 cw(c83.298,4.604) 84.836,3.066 K1.L8.9@84.2,2.43
NetK1.L8_12: K1.L8.12 VD1.L8.1 VT1.L8.3 | length 11.4
  Bottom Layer w0.508: VD1.L8.1@89.5,3.78 91.89,3.78 ; K1.L8.12@91.82,2.43 91.82,3.71 91.89,3.78 ; VT1.L8.3@93.68,10.41 93.68,5.145 92.315,3.78 91.89,3.78
NetK2.L8_4: K2.L8.4 R6.L8.1 | length 38.3
  Bottom Layer w0.3: K2.L8.4@69.17,7.51 69.17,15.201 69.17,15.203 cw(c72.054,15.203) 70.014,17.242 cw(c71.988,15.269) 71.988,18.06 76.768,18.06 ccw(c76.768,20.6) 78.564,18.804 85.646,25.886 ccw(c83.85,27.682) 86.39,27.682 86.39,33.055 ccw(c85.605,33.055) 86.16,33.61 ccw(c85.73,33.18) 85.73,33.788 R6.L8.1@84.855,33.788
NetK2.L8_9: K2.L8.9 R5.L8.1 | length 47.5
  Bottom Layer w0.3: K2.L8.9@69.17,2.43 69.702,2.962 ccw(c67.906,4.758) 70.446,4.758 70.446,14.876 cw(c72.819,14.876) 71.14,16.553 cw(c72.917,14.778) 72.917,17.29 77.188,17.29 ccw(c77.188,19.83) 78.984,18.034 86.376,25.426 ccw(c84.58,27.222) 87.12,27.222 87.12,36.42 87.12,36.422 ccw(c86.027,36.422) 86.8,37.195 86.798,37.197 ccw(c85.967,36.362) 85.967,37.54 85.965,37.54 R5.L8.1@84.855,37.54
NetK2.L8_12: K2.L8.12 VD2.L8.1 VT2.L8.3 | length 11.8
  Bottom Layer w0.508: VT2.L8.3@74.99,10.41 74.99,4.39 75.67,3.71 76.79,3.71 ; K2.L8.12@76.79,2.43 76.79,3.71 ; VD2.L8.1@79.248,3.71 76.79,3.71
NetR1.L3_1: R1.L3.1 VT1.L3.1 | length 1.5
  Top Layer w0.508: VT1.L3.1@105.86,26 105.86,24.725 R1.L3.1@106.05,24.535
NetR1.L4_1: R1.L4.1 X1.L4.3 | length 4.1
  Top Layer w0.3: X1.L4.3@8.375,6.32 9.471,6.32 9.83,5.961 9.83,4.89 10.49,4.23 10.54,4.23 10.84,3.93 R1.L4.1@10.84,3.88
NetR2.L3_1: R2.L3.1 VT2.L3.1 | length 1.7
  Top Layer w0.508: VT2.L3.1@94.17,5.665 94.17,7.27 R2.L3.1@94.24,7.34
NetR2.L4_1: R2.L4.1 X1.L4.4 | length 3.2
  Top Layer w0.3: X1.L4.4@8.375,6.82 9.874,6.82 R2.L4.1@11.089,5.605
NetR3.L3_1: R3.L3.1 VT1.L3.3 VT3.L3.1 | length 5.2
  Top Layer w0.508: R3.L3.1@105.275,32.49 105.275,29.785 VT3.L3.1@105.664,29.396 ; VT3.L3.1@105.886,29.004 VT1.L3.3@106.693,28.197 ; VT3.L3.1@106.006,29.004 105.86,29.15 VT3.L3.1@105.86,29.2 ; VT3.L3.1@105.664,29.396 VT3.L3.1@105.86,29.2 ; VT3.L3.1@105.664,29.396 105.714,29.396 105.86,29.25 VT3.L3.1@105.86,29.2
NetR3.L4_1: R3.L4.1 X1.L4.9 | length 3
  Top Layer w0.2: v1(6.165,9.32) X1.L4.9@8.02,9.32
  Bottom Layer w0.2: R3.L4.1@5.19,8.81 5.7,9.32 v1(6.165,9.32)
NetR3.L8_1: R3.L8.1 R4.L8.2 VT1.L8.1 | length 3.2
  Bottom Layer w0.3: VT1.L8.1@92.73,12.41 R3.L8.1@92.73,15.61
NetR4.L3_1: R4.L3.1 VT2.L3.3 VT4.L3.1 | length 3.4
  Top Layer w0.508: VT2.L3.3@96.259,4.711 VT4.L3.1@97.186,5.639 ; VT4.L3.1@97.096,5.519 97.239,5.519 VT4.L3.1@97.385,5.665 97.385,7.155 R4.L3.1@97.2,7.34
NetR4.L4_1: R4.L4.1 X1.L4.10 | length 2.8
  Top Layer w0.2: v1(7.06,9.82) X1.L4.10@7.77,9.82
  Bottom Layer w0.2: R4.L4.1@5.16,10.22 5.56,9.82 v1(7.06,9.82)
NetR6.L5_2: R6.L5.2 R8.L5.1 | length 1.8
  Bottom Layer w0.3: R6.L5.2@15.99,30.63 R8.L5.1@15.99,32.39
NetR6.L6_2: R6.L6.2 X1.L6.4 | length 5
  Top Layer w0.7: v1(11.99,55.69) v1(13.35,55.69) X1.L6.4@14.725,55.69
  Bottom Layer w0.7: v1(11.99,55.69) v1(12.67,55.69) v1(13.35,55.69) R6.L6.2@14.265,55.69
NetR7.L6_2: R7.L6.2 X1.L6.9 | length 2.3
  Top Layer w0.3: X1.L6.9@14.725,61.19 R7.L6.2@17.01,61.19
NetR7.L8_1: R7.L8.1 R8.L8.2 VT2.L8.1 | length 3.5
  Bottom Layer w0.3: VT2.L8.1@74.04,12.41 74.04,15.61 R7.L8.1@74.24,15.81
NetR9.L4_2: R9.L4.2 VD2.L4.1 | length 1.8
  Top Layer w0.3: VD2.L4.1@3.84,19.12 R9.L4.2@5.6,19.12
NetR10.L4_2: R10.L4.2 VD3.L4.1 | length 1.8
  Top Layer w0.3: VD3.L4.1@3.84,15.41 R10.L4.2@5.6,15.41
NetR11.L4_2: R11.L4.2 VD4.L4.1 | length 1.8
  Top Layer w0.3: VD4.L4.1@3.84,17.265 R11.L4.2@5.6,17.265
NetR14.L5_2: R14.L5.2 VD1.L5.1 | length 1.8
  Top Layer w0.3: VD1.L5.1@3.84,22.85 R14.L5.2@5.6,22.85
NetR17.L2_1: R17.L2.1 R18.L2.2 VT1.L2.1 | length 4.3
  Bottom Layer w0.3: VT1.L2.1@91.63,40.62 91.63,39.72 91.86,39.49 93.06,39.49 R18.L2.2@93.11,39.44 93.11,37.64 R17.L2.1@93.1,37.63
NetR20.L2_1: R20.L2.1 SA3.L2.1 | length 1.5
  Top Layer w0.3: R20.L2.1@41.835,39.357 SA3.L2.1@41.835,40.879
NetR21.L2_1: R21.L2.1 SA3.L2.2 | length 1.6
  Top Layer w0.3: SA3.L2.2@43.33,40.99 cw(c43.282,40.942) 43.35,40.942 R21.L2.1@43.35,39.42
NetR22.L2_1: R22.L2.1 SA3.L2.3 | length 1.5
  Top Layer w0.3: R22.L2.1@44.836,39.442 SA3.L2.3@44.836,40.964
NetR22.L3_2: R22.L3.2 VD2.L3.1 | length 1.8
  Top Layer w0.3: VD2.L3.1@3.84,20.98 R22.L3.2@5.6,20.98
NetR32.L2_2: R32.L2.2 VD4.L2.1 | length 1.8
  Top Layer w0.3: VD4.L2.1@3.84,24.71 R32.L2.2@5.6,24.71
NetR36.L2_2: R36.L2.2 VD5.L2.1 | length 1.8
  Top Layer w0.3: VD5.L2.1@3.84,26.57 R36.L2.2@5.6,26.57
NetR40.L2_1: R40.L2.1 VD3.L2.2 | length 1.8
  Top Layer w0.3: R40.L2.1@51.12,13.62 VD3.L2.2@51.12,15.38
NetVD1.L2_2: VD1.L2.2 VD2.L2.2 VT1.L2.3 | length 75.2
  Middle Layer 2 w0.3: v1(34.222,50.12) 35.052,50.95 55.01,50.95 56.75,52.69 83.63,52.69 90.67,45.65 v1(90.67,42.645)
  Bottom Layer w0.3: v1(34.222,50.12) 34.222,44.718 35.703,43.237 35.703,43.081 37.525,41.258 VD1.L2.2@37.525,40.079 ; VD1.L2.2@37.555,40.089 VD1.L2.2@37.774,39.87
ON_RELE1_M0: D1.L2.V11 R3.L8.2 | length 59.5
  Top Layer w0.2: D1.L2.V11@49.42,21.36 v1(49.82,20.96)
  Middle Layer 3 w0.1: v1(49.82,20.96) 50.226,21.366 50.877,21.366 51.679,20.565 51.679,19.069 51.923,18.824 52.41,18.824 53.376,17.858 53.376,12.59 55.332,10.635 64.942,10.635 69.667,15.36 v1@96.22,15.36
  Bottom Layer w0.3: R3.L8.2@94.44,15.81 95.736,15.81 v1(96.213,15.333)
ON_RELE2_M0: D1.L2.V10 R7.L8.2 | length 41.9
  Top Layer w0.2: v1(48.22,20.96) D1.L2.V10@48.62,21.36
  Middle Layer 3 w0.1: v1(48.22,20.96) 48.622,20.558 51.097,20.558 51.388,20.267 51.388,18.883 51.757,18.513 52.257,18.513 53.07,17.7 53.07,12.413 55.254,10.229 64.999,10.229 69.695,14.925 77.311,14.925 v1(77.316,14.93)
  Bottom Layer w0.3: R7.L8.2@75.76,15.81 75.776,15.794 76.484,15.794 v1@77.307,14.971
PL_B13_CLK: D1.L2.Y7 R12.L2.2 | length 3.1
  Top Layer w0.2: v1(45.82,19.36) D1.L2.Y7@46.22,19.76
  Bottom Layer w0.2: v1(45.82,19.36) 45.82,17.13 R12.L2.2@46.05,16.9
PL_CLK: C5.L2.1 D1.L2.H16 | length 18.1
  Top Layer w0.1: D1.L2.H16@53.42,29.36 v1(53.82,29.76)
  Bottom Layer w0.12: C5.L2.1@47.9,16.9 ccw(c47.9,17.07) 48.02,16.95 48.62,17.55 ccw(c47.751,18.419) 48.98,18.419 48.98,28.386 cw(c50.038,28.386) 49.29,29.134 49.315,29.159 cw(c49.77,28.705) 49.77,29.348 53.202,29.348 ccw(c53.202,29.844) 53.553,29.493 v1(53.82,29.76)
PL_DDR_B34_VREF: C3.L2.2 D1.L2.R14 D1.L2.R17 R8.L2.1 | length 1.1
  Top Layer w0.2: D1.L2.R14@51.82,23.76 v1(52.22,24.16) ; v1(53.82,24.16) D1.L2.R17@54.22,23.76
PL_DDR_B35_VREF: C2.L2.2 D1.L2.F17 D1.L2.G15 R7.L2.1 | length 1.1
  Top Layer w0.2: D1.L2.G15@52.62,30.16 v1(53.02,30.56) ; v1(53.82,30.56) D1.L2.F17@54.22,30.96
PL_REF_CLK: C6.L2.1 D1.L2.J18 | length 18.1
  Top Layer w0.2: D1.L2.J18@55.02,28.56 v1(55.42,28.96)
  Bottom Layer w0.12: C6.L2.1@49.363,17.07 49.363,28.086 ; 49.363,28.088 cw(c49.842,28.088) 49.503,28.426 ; 49.504,28.427 cw(c49.848,28.081) 49.848,28.569 54.841,28.569 ccw(c54.841,29.024) 55.162,28.702 v1(55.42,28.96)
PROG_B_0: D1.L2.L6 R37.L2.2 | length 8.8
  Top Layer w0.1: R37.L2.2@38.46,27.06 38.507,27.107 v1(38.507,28.11)
  Top Layer w0.2: v1(45.02,26.56) D1.L2.L6@45.42,26.96
  Middle Layer 2 w0.1: v1@38.507,28.032 v1(38.507,28.11)
  Middle Layer 4 w0.1: v1@38.507,28.032 38.798,27.74 43.84,27.74 v1(45.02,26.56)
PS_CLK: D4.L2.3 R19.L2.1 | length 2.1
  Top Layer w0.15: D4.L2.3@46.743,41.435 47.06,41.118 R19.L2.1@47.06,39.42
PS_DDR_VRN: D1.L2.G5 R1.L2.2 | length 0.6
  Top Layer w0.2: v1(44.22,30.56) D1.L2.G5@44.62,30.16
PS_DDR_VRP: D1.L2.H5 R2.L2.2 | length 0.6
  Top Layer w0.2: v1(44.22,29.76) D1.L2.H5@44.62,29.36
PS_MIO0: D1.L2.E6 VD4.L2.2 | length 60.9
  Top Layer w0.2: v1(45.02,32.16) D1.L2.E6@45.42,31.76
  Top Layer w0.3: VD4.L2.2@2.32,24.71 VD4.L2.2@2.32,24.76 ; VD4.L2.2@2.32,24.82 v1@3.14,25.64
  Middle Layer 2 w0.1: v1(3.09,25.62) 3.09,23.57 10.03,16.63 27.938,16.63 32.38,21.072 41.91,21.072 43.801,22.963 45.236,22.963 45.421,23.148 45.421,31.759 v1(45.02,32.16)
PS_MIO1: D1.L2.A7 D3.L2.1 R30.L2.2 | length 19.7
  Top Layer w0.2: v1(45.82,35.36) D1.L2.A7@46.22,34.96
  Middle Layer 3 w0.1: v1@39.395,44.195 39.93,43.66 39.965,43.625 ccw(c40.107,43.766) 40.248,43.625 40.5,43.877 cw(c40.641,43.735) 40.783,43.877 cw(c40.641,43.735) 40.783,43.594 40.39,43.201 ccw(c40.532,43.06) 40.39,42.919 ccw(c40.532,43.06) 40.673,42.919 41.056,43.302 cw(c41.198,43.16) 41.339,43.302 cw(c41.198,43.16) 41.339,43.019 41.097,42.776 ccw(c41.238,42.635) 41.097,42.493 42.05,41.54 42.28,41.31 cw(c40.484,39.514) 43.024,39.514 43.024,36.485 ccw(c43.344,36.485) 43.118,36.259 43.737,35.64 cw(c43.538,35.44) 43.82,35.44 43.82,35.308 ccw(c44.172,35.308) 43.923,35.059 43.934,35.048 ccw(c44.147,35.261) 44.147,34.96 45.282,34.96 ; 45.282,34.96 ccw(c45.282,35.292) 45.518,35.058 v1(45.82,35.36)
  Bottom Layer w0.3: R30.L2.2@38.52,42.68 38.624,42.784 38.624,43.404 40.155,44.935 D3.L2.1@40.69,44.935
  other v1: 39.419,44.219
PS_MIO2: D1.L2.B8 D3.L2.5 R23.L2.2 | length 21.8
  Top Layer w0.2: v1(46.62,34.56) D1.L2.B8@47.02,34.16
  Middle Layer 3 w0.1: v1(46.62,34.56) 46.43,34.75 cw(c46.924,35.245) 46.225,35.245 46.225,39.7 46.225,39.75 ccw(c46.025,39.75) 46.025,39.95 45.48,39.95 cw(c45.48,40.15) 45.48,40.35 46.025,40.35 ccw(c46.025,40.55) 46.225,40.55 46.225,40.833 46.225,42.063 cw(c48.765,42.063) 46.969,43.859 48.91,45.8 ccw(c48.62,46.09) 49.03,46.09 49.03,48.06 ccw(c48.439,48.06) 48.857,48.478 v1(48.59,48.745)
  Bottom Layer w0.1: R23.L2.2@45.97,37.9 R23.L2.2@46.23,37.64 ; R23.L2.2@45.97,37.945 R23.L2.2@46.233,37.682 ; R23.L2.2@46.233,37.8 R23.L2.2@46.233,37.682 ; v1(46.62,34.56) 46.62,34.803 46.233,35.19 R23.L2.2@46.233,37.682
PS_MIO3: D1.L2.D6 D3.L2.2 R24.L2.2 | length 18.6
  Top Layer w0.2: v1(45.02,32.96) D1.L2.D6@45.42,32.56
  Bottom Layer w0.1: R24.L2.2@40.39,41.16 39.99,41.56 39.933,41.56 39.715,41.777 cw(c40.358,42.42) 39.449,42.42 39.449,42.94 cw(c40.401,42.94) 39.728,43.613 39.78,43.665 cw(c40.433,43.012) 40.433,43.936 41.172,43.936 ccw(c41.172,44.937) 41.88,44.229 ccw(c41.424,44.685) 42.068,44.685 42.068,44.965 ccw(c40.949,44.965) 41.041,46.08 41.037,46.08 40.992,46.08 cw(c40.992,46.507) D3.L2.2@40.69,46.205 ; R24.L2.2@40.717,40.902 41.018,40.6 cw(c40.266,39.848) 41.33,39.848 41.33,37.562 ccw(c42.013,37.562) 41.53,37.079 42.881,35.728 cw(c42.512,35.36) 43.033,35.36 43.033,35.326 ccw(c43.466,35.326) 43.16,35.02 ccw(c43.305,35.165) 43.305,34.96 43.465,34.96 ; 43.466,34.96 cw(c43.466,34.563) 43.747,34.844 cw(c43.58,34.678) 43.815,34.678 43.815,34.562 ; 43.815,34.561 ccw(c44.258,34.561) 43.946,34.248 ccw(c44.22,34.523) 44.22,34.134 44.321,34.134 cw(c44.321,33.803) 44.555,34.037 cw(c44.362,33.844) 44.635,33.844 44.635,33.665 ccw(c45.408,33.665) 44.862,33.118 v1(45.02,32.96)